# Altium PCB PCB.PcbDoc (part 7 of 10)
Units mm, origin at the board's own origin, x right, y up, seen from the top; angles counter-clockwise.
Board outline 100.5 x 147.95 mm, 6 copper layers (Top Layer, Layer 2 (GND), Layer 3, Layer 4, Layer 5 (AGND), Bottom Layer), stack 1.449 mm thick; 511 components, 297 nets, 1620 pads, 565 vias.
Unrouted connection lines stored in the file: 597.
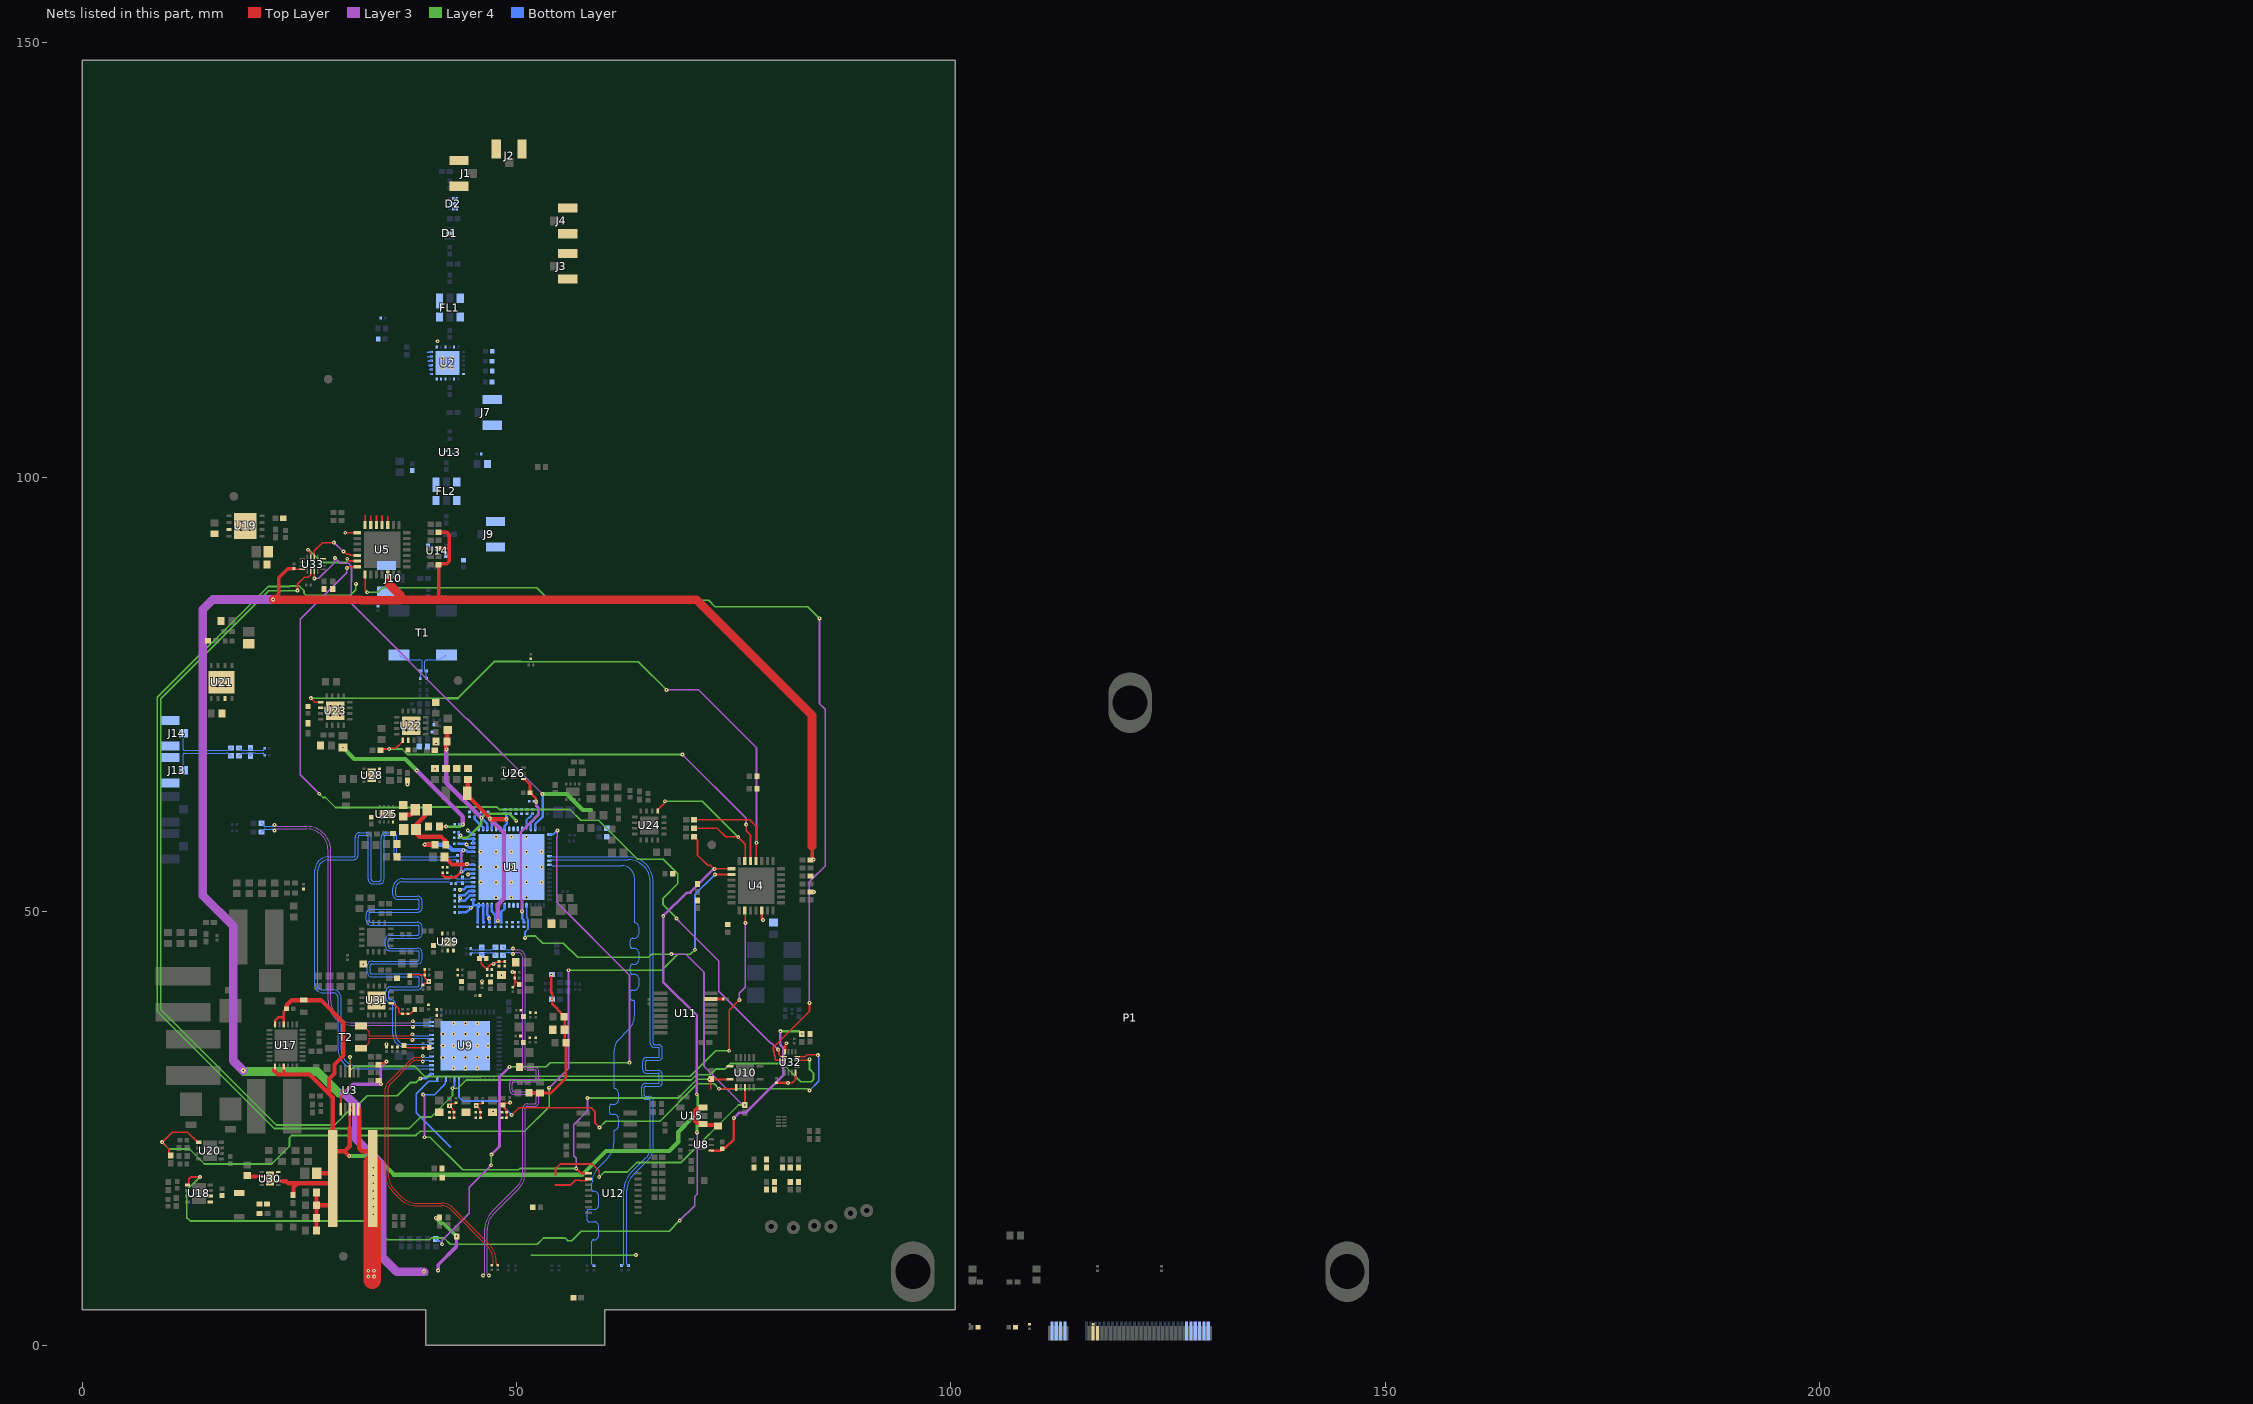
[diagram p5: the nets of this part, all layers, seen from the top]

## Part data (continued)
U18 U20: "IC REG LDO ADJ 1.5A 8DFN", Case/Package=DFN, Dropout Voltage=330mV, Input Bias Current=120uA, Manufacturer 1=Microchip, Max Input Voltage=6V, Max Operating Temperature=125°C, Max Output Current=1.5A, Min Input Voltage=2.3V, Min Operating Temperature=-40°C, Output Voltage=5V, Package Quantity=3300, Reference Voltage=410mV, Supplier Part Number 1=MCP1727T-ADJE/MFCT-ND, Accuracy=0.5%, ComponentLink1Description=https://datasheet.ciiva.com/2057/21999b-2057048.pdf?src-supplier=Digi-Key, ComponentLink1URL=https://datasheet.ciiva.com/2057/21999b-2057048.pdf?src-supplier=Digi-Key, ComponentLink2Description=https://datasheet.ciiva.com/8237/jp027822-8237704.pdf?src-supplier=Avnet, ComponentLink2URL=https://datasheet.ciiva.com/8237/jp027822-8237704.pdf?src-supplier=Avnet, ComponentLink3Description=https://datasheet.ciiva.com/17364/jp027822-17364137.pdf?src-supplier=Avnet+Europe, ComponentLink3URL=https://datasheet.ciiva.com/17364/jp027822-17364137.pdf?src-supplier=Avnet+Europe, Contact Plating=Tin,Matte, Lead Free="Lead Free", Manufacturer Part Number 1=MCP1727T-ADJE/MF, Mount="Surface Mount", Number of Outputs=1, Output Current=1.5A, Output Type=Adjustable, Packaging="Tape and Reel", Polarity=Positive, Pricing 1="1=0.84000, 25=0.71080, 100=0.63860 (USD)", Quiescent Current=120uA, Radiation Hardening=No, RoHS=Yes, Stock 1=9419, Supplier 1=Digi-Key
U19 U21: "Low Dropout Regulators - LDO Micropower 800mA Low Noise Adj Vltg Reg", Dropout Voltage=475mV, Manufacturer 1="Texas Instruments", Max Input Voltage=16V, Max Operating Temperature=125°C, Max Output Current=800mA, Max Output Voltage=5.5V, Min Input Voltage=2.5V, Min Operating Temperature=-40°C, Min Output Voltage=1V, Output Voltage Accuracy=1%, Package Quantity=1000, Quiescent Current=5.5mA, Supplier Part Number 1=LP3878SD-ADJ/NOPBCT-ND, Accuracy=1%, ComponentLink1Description=https://datasheet.ciiva.com/27052/1329588-27052012.pdf?src-supplier=Jameco, ComponentLink1URL=https://datasheet.ciiva.com/27052/1329588-27052012.pdf?src-supplier=Jameco, ComponentLink2Description=https://datasheet.ciiva.com/1571/1846896-1571038.pdf?src-supplier=Farnell, ComponentLink2URL=https://datasheet.ciiva.com/1571/1846896-1571038.pdf?src-supplier=Farnell, ComponentLink3Description=https://datasheet.ciiva.com/7992/1814893-7992723.pdf?src-supplier=Element14, ComponentLink3URL=https://datasheet.ciiva.com/7992/1814893-7992723.pdf?src-supplier=Element14, ComponentLink4Description=https://datasheet.ciiva.com/25626/0900766b810fa759-25626986.pdf?src-supplier=RSComponents, ComponentLink4URL=https://datasheet.ciiva.com/25626/0900766b810fa759-25626986.pdf?src-supplier=RSComponents, ComponentLink5Description=https://datasheet.ciiva.com/6595/lp3878-adj-6595783.pdf?src-supplier=Digi-Key, ComponentLink5URL=https://datasheet.ciiva.com/6595/lp3878-adj-6595783.pdf?src-supplier=Digi-Key, ComponentLink6Description=https://datasheet.ciiva.com/25974/lp3878-adj-25974985.pdf?src-supplier=Avnet+Europe, ComponentLink6URL=https://datasheet.ciiva.com/25974/lp3878-adj-25974985.pdf?src-supplier=Avnet+Europe, ComponentLink7Description=https://datasheet.ciiva.com/3223/lp3878-adj-3223946.pdf?src-supplier=Avnet, ComponentLink7URL=https://datasheet.ciiva.com/3223/lp3878-adj-3223946.pdf?src-supplier=Avnet, ComponentLink8Description=https://datasheet.ciiva.com/6595/lp3878-adj-6595786.pdf?src-supplier=Digi-Key, ComponentLink8URL=https://datasheet.ciiva.com/6595/lp3878-adj-6595786.pdf?src-supplier=Digi-Key, ComponentLink9Description=https://datasheet.ciiva.com/46419/lp3878-adj-46419375.pdf?src-supplier=Element14, ComponentLink9URL=https://datasheet.ciiva.com/46419/lp3878-adj-46419375.pdf?src-supplier=Element14, Contact Plating=Tin,Matte, Height=0.8mm, Lead Free="Lead Free", Length=4mm, Manufacturer Part Number 1=LP3878SD-ADJ/NOPB, Mount="Surface Mount", Number of Outputs=1, Number of Pins=8, Number of Regulators=1, Output Current=800mA, Output Type=Adjustable, Output Voltage=5.5V, Packaging="Tape and Reel", Polarity=Positive, Pricing 1="1=2.14000, 10=1.92200, 100=1.54450, 500=1.26896 (USD)", Radiation Hardening=No, REACH SVHC="No SVHC", RoHS=Yes, Stock 1=29951, Supplier 1=Digi-Key, Width=4mm
U25 U27 U28: "IC REG LIN POS ADJ 500MA 8LFCSP", Case/Package=MSOP, Dropout Voltage=130mV, Manufacturer="Analog Devices", Max Input Voltage=5.5V, Max Operating Temperature=125°C, Max Output Current=500mA, Max Output Voltage=5V, Max Supply Current=210uA, Min Current Limit=550mA, Min Input Voltage=2.3V, Min Operating Temperature=-40°C, Min Output Voltage=800mV, Nominal Supply Current=45uA, Power Supply Rejection Ratio (PSRR)=60dB, Reference Voltage=500mV, Supplier Part Number 1=2457144, Accuracy=1%, ComponentLink1Description=https://datasheet.ciiva.com/17365/adp124-125-17365589.pdf?src-supplier=Avnet+Europe, ComponentLink1URL=https://datasheet.ciiva.com/17365/adp124-125-17365589.pdf?src-supplier=Avnet+Europe, ComponentLink2Description=https://datasheet.ciiva.com/2056/adp124-125-2056955.pdf?src-supplier=Digi-Key, ComponentLink2URL=https://datasheet.ciiva.com/2056/adp124-125-2056955.pdf?src-supplier=Digi-Key, ComponentLink3Description=https://datasheet.ciiva.com/2056/adp124-125-2056954.pdf?src-supplier=Digi-Key, ComponentLink3URL=https://datasheet.ciiva.com/2056/adp124-125-2056954.pdf?src-supplier=Digi-Key, ComponentLink4Description=https://datasheet.ciiva.com/2056/adp124-125-2056956.pdf?src-supplier=Digi-Key, ComponentLink4URL=https://datasheet.ciiva.com/2056/adp124-125-2056956.pdf?src-supplier=Digi-Key, ComponentLink5Description=https://datasheet.ciiva.com/48694/001251247-da-01-en-ic-reg-l-adj-adp125acpz-r7-lfcspud-8-adi-48694599.pdf?src-supplier=Conrad, ComponentLink5URL=https://datasheet.ciiva.com/48694/001251247-da-01-en-ic-reg-l-adj-adp125acpz-r7-lfcspud-8-adi-48694599.pdf?src-supplier=Conrad, ComponentLink6Description=http://datasheet.octopart.com/ADP125ACPZ-R7-Analog-Devices-datasheet-11525030.pdf?src-supplier=Newark, ComponentLink6URL=http://datasheet.octopart.com/ADP125ACPZ-R7-Analog-Devices-datasheet-11525030.pdf?src-supplier=Newark, ComponentLink7Description=http://datasheet.octopart.com/ADP125ACPZ-R7-Analog-Devices-datasheet-38878834.pdf?src-supplier=Newark, ComponentLink7URL=http://datasheet.octopart.com/ADP125ACPZ-R7-Analog-Devices-datasheet-38878834.pdf?src-supplier=Newark, ComponentLink8Description=http://datasheet.octopart.com/ADP125ACPZ-R7-Analog-Devices-datasheet-10623001.pdf?src-supplier=Analog+Devices, ComponentLink8URL=http://datasheet.octopart.com/ADP125ACPZ-R7-Analog-Devices-datasheet-10623001.pdf?src-supplier=Analog+Devices, ComponentLink9Description=http://datasheet.octopart.com/ADP125ACPZ-R7-Analog-Devices-datasheet-8638579.pdf?src-supplier=Analog+Devices, ComponentLink9URL=http://datasheet.octopart.com/ADP125ACPZ-R7-Analog-Devices-datasheet-8638579.pdf?src-supplier=Analog+Devices, ComponentLink10Description=http://datasheet.octopart.com/ADP125ACPZ-R7-Analog-Devices-datasheet-11776558.pdf?src-supplier=Arrow, ComponentLink10URL=http://datasheet.octopart.com/ADP125ACPZ-R7-Analog-Devices-datasheet-11776558.pdf?src-supplier=Arrow, Contact Plating=Gold, Height=0.6mm, Lead Free="Contains Lead", Length=2mm, Manufacturer 2="Analog Devices", Manufacturer Part Number=ADP125ACPZ-R7, Manufacturer Part Number 2=ADP125ACPZ-R7, Number of Outputs=1, Number of Pins=8, Number of Regulators=1, Operating Supply Current=45uA, Output Current=500mA, Output Type=Adjustable, Output Voltage=5V, Packaging="Tape and Reel", Polarity=Positive, Pricing 2="1=1.39000, 10=1.23900, 25=1.17600, 100=0.96600, 250=0.90300, 500=0.79800, 1000=0.63000 (USD)", Quiescent Current=45uA, REACH SVHC="No SVHC", RoHS=Yes, Stock 1=261, Stock 2=12322, Supplier 1=Farnell, Supplier 2=Digi-Key, Supplier Part Number 2=ADP125ACPZ-R7CT-ND, Width=2mm
U29: "TEXAS INSTRUMENTS         TPS7A3501DRVT            LDO Voltage Regulator, Adjustable, 1.71V to 5V in, 330mV drop, 1.21V to 4.5V/1A out, SON-6", Dropout Voltage=330mV, Manufacturer="Texas Instruments", Max Input Voltage=5V, Max Operating Temperature=125°C, Max Output Current=1A, Max Output Voltage=4.5V, Min Current Limit=1.1A, Min Input Voltage=1.71V, Min Operating Temperature=-40°C, Min Output Voltage=1.21V, Package Quantity=250, Quiescent Current=2.2mA, Supplier Part Number 1=296-37133-1-ND, ComponentLink1Description=https://datasheet.ciiva.com/28435/1776766-28435910.pdf?src-supplier=Element14, ComponentLink1URL=https://datasheet.ciiva.com/28435/1776766-28435910.pdf?src-supplier=Element14, ComponentLink2Description=https://datasheet.ciiva.com/29569/tps7a3501-29569542.pdf?src-supplier=Digi-Key, ComponentLink2URL=https://datasheet.ciiva.com/29569/tps7a3501-29569542.pdf?src-supplier=Digi-Key, ComponentLink3Description=https://datasheet.ciiva.com/29569/tps7a3501-29569543.pdf?src-supplier=Digi-Key, ComponentLink3URL=https://datasheet.ciiva.com/29569/tps7a3501-29569543.pdf?src-supplier=Digi-Key, ComponentLink4Description=https://datasheet.ciiva.com/29569/tps7a3501-29569544.pdf?src-supplier=Digi-Key, ComponentLink4URL=https://datasheet.ciiva.com/29569/tps7a3501-29569544.pdf?src-supplier=Digi-Key, ComponentLink5Description=https://datasheet.ciiva.com/30016/tps7a3501-30016008.pdf?src-supplier=Avnet, ComponentLink5URL=https://datasheet.ciiva.com/30016/tps7a3501-30016008.pdf?src-supplier=Avnet, Lead Free="Lead Free", Manufacturer Part Number=TPS7A3501DRVT, Mount="Surface Mount", Number of Outputs=1, Number of Pins=6, Number of Regulators=1, Output Current=1A, Output Type=Adjustable, Output Voltage=4.5V, Packaging="Tape and Reel", Polarity=Positive, Pricing 1="1 = 2,31000, 10 = 2,07200, 100 = 1,66520 (USD)", Radiation Hardening=No, REACH SVHC="No SVHC", RoHS=Yes, Stock 1=4410, Supplier 1=Digi-Key, Weight=0.000342oz
U30: "IC REG BUCK 5V 1A SYNC 8WSON", Case/Package=SOIC, Manufacturer 1="Texas Instruments", Max Input Voltage=17V, Max Operating Temperature=125°C, Max Output Current=1A, Max Output Voltage=5V, Min Input Voltage=3V, Min Operating Temperature=-40°C, Package Quantity=1, Quiescent Current=17uA, Supplier Part Number 1=296-29898-1-ND, Switching Frequency=2.25MHz, ComponentLink1Description=https://datasheet.ciiva.com/4880/slvsam2a-198231-4880752.pdf?src-supplier=Mouser, ComponentLink1URL=https://datasheet.ciiva.com/4880/slvsam2a-198231-4880752.pdf?src-supplier=Mouser, ComponentLink2Description=https://datasheet.ciiva.com/2034/tps62160-2034672.pdf?src-supplier=Digi-Key, ComponentLink2URL=https://datasheet.ciiva.com/2034/tps62160-2034672.pdf?src-supplier=Digi-Key, ComponentLink3Description=https://datasheet.ciiva.com/2034/tps62160-2034673.pdf?src-supplier=Digi-Key, ComponentLink3URL=https://datasheet.ciiva.com/2034/tps62160-2034673.pdf?src-supplier=Digi-Key, ComponentLink4Description=https://datasheet.ciiva.com/2034/tps62160-2034674.pdf?src-supplier=Digi-Key, ComponentLink4URL=https://datasheet.ciiva.com/2034/tps62160-2034674.pdf?src-supplier=Digi-Key, Contact Plating=Gold, Lead Free="Lead Free", Manufacturer Part Number 1=TPS62163DSGR, Min Output Voltage=5V, Number of Outputs=1, Number of Pins=8, Operating Supply Voltage=17V, Output Configuration=Positive, Output Current=1A, Output Type=Fixed, Output Voltage=5V, Packaging="Tape and Reel", Pricing 1="1=1.79000, 10=1.61000, 100=1.29440, 500=1.06348, 1000=0.88117 (USD)", REACH SVHC="No SVHC", RoHS=Yes, Stock 1=19908, Supplier 1=Digi-Key, Synchronous Rectifier=Yes
U31: "IC REG LIN POS ADJ 800MA 16LFCSP", Case/Package="LFCSP EP", Dropout Voltage=70mV, Manufacturer="Analog Devices", Max Input Voltage=3.6V, Max Operating Temperature=125°C, Max Output Current=800mA, Max Output Voltage=3V, Max Supply Current=1.4mA, Min Current Limit=1A, Min Input Voltage=1.6V, Min Operating Temperature=-40°C, Min Output Voltage=750mV, Power Supply Rejection Ratio (PSRR)=65dB, Supplier Part Number 1=ADP1753ACPZ-R7CT-ND, Accuracy=2%, ComponentLink1Description=https://datasheet.ciiva.com/26908/adp1753acpz-r7-26908167.pdf?src-supplier=IIIC, ComponentLink1URL=https://datasheet.ciiva.com/26908/adp1753acpz-r7-26908167.pdf?src-supplier=IIIC, ComponentLink2Description=https://datasheet.ciiva.com/8241/adp1752-1753-8241910.pdf?src-supplier=Avnet, ComponentLink2URL=https://datasheet.ciiva.com/8241/adp1752-1753-8241910.pdf?src-supplier=Avnet, ComponentLink3Description=https://datasheet.ciiva.com/2041/adp1752-1753-2041241.pdf?src-supplier=Digi-Key, ComponentLink3URL=https://datasheet.ciiva.com/2041/adp1752-1753-2041241.pdf?src-supplier=Digi-Key, ComponentLink4Description=https://datasheet.ciiva.com/2041/adp1752-1753-2041242.pdf?src-supplier=Digi-Key, ComponentLink4URL=https://datasheet.ciiva.com/2041/adp1752-1753-2041242.pdf?src-supplier=Digi-Key, ComponentLink5Description=https://datasheet.ciiva.com/2041/adp1752-1753-2041243.pdf?src-supplier=Digi-Key, ComponentLink5URL=https://datasheet.ciiva.com/2041/adp1752-1753-2041243.pdf?src-supplier=Digi-Key, ComponentLink6Description=https://datasheet.ciiva.com/17365/adp1752-1753-17365277.pdf?src-supplier=Avnet+Europe, ComponentLink6URL=https://datasheet.ciiva.com/17365/adp1752-1753-17365277.pdf?src-supplier=Avnet+Europe, Height=0.83mm, Lead Free="Contains Lead", Length=4mm, Manufacturer Part Number=ADP1753ACPZ-R7, Nominal Supply Current=1.4mA, Number of Outputs=1, Number of Pins=16, Number of Regulators=1, Operating Supply Current=1.4mA, Output Current=800mA, Output Type=Adjustable, Output Voltage=3V, Packaging="Tape and Reel", Polarity=Positive, Pricing 1="1 = 2,85000, 10 = 2,56400, 25 = 2,41880, 100 = 2,06070, 250 = 1,93496, 500 = 1,69308 (USD)", Radiation Hardening=No, REACH SVHC="No SVHC", RoHS=Yes, Stock 1=1570, Supplier 1=Digi-Key, Width=4mm
U32 U33: "IC TRNSLTR BIDIRECTIONAL 16UQFN", High Level Output Current=-20uA, Low Level Output Current=20uA, Manufacturer 1="Texas Instruments", Max Operating Temperature=85°C, Max Supply Voltage=3.6V, Min Operating Temperature=-40°C, Min Supply Voltage=900mV, Nominal Supply Current=5uA, Package Quantity=1, Quiescent Current=10uA, Supplier Part Number 1=296-29681-1-ND, ComponentLink1Description=https://datasheet.ciiva.com/1900/txb0304-1900817.pdf?src-supplier=Digi-Key, ComponentLink1URL=https://datasheet.ciiva.com/1900/txb0304-1900817.pdf?src-supplier=Digi-Key, ComponentLink2Description=https://datasheet.ciiva.com/15096/getdatasheetpartid-490462-15096317.pdf?src-supplier=Verical, ComponentLink2URL=https://datasheet.ciiva.com/15096/getdatasheetpartid-490462-15096317.pdf?src-supplier=Verical, ComponentLink3Description=https://datasheet.ciiva.com/1900/txb0304-1900818.pdf?src-supplier=Digi-Key, ComponentLink3URL=https://datasheet.ciiva.com/1900/txb0304-1900818.pdf?src-supplier=Digi-Key, ComponentLink4Description=https://datasheet.ciiva.com/1900/txb0304-1900819.pdf?src-supplier=Digi-Key, ComponentLink4URL=https://datasheet.ciiva.com/1900/txb0304-1900819.pdf?src-supplier=Digi-Key, ComponentLink5Description=https://datasheet.ciiva.com/14287/txb0304-14287243.pdf?src-supplier=Avnet, ComponentLink5URL=https://datasheet.ciiva.com/14287/txb0304-14287243.pdf?src-supplier=Avnet, Contact Plating=Gold, Data Rate=140Mbps, Lead Free="Lead Free", Logic Function=Translator, Manufacturer Part Number 1=TXB0304RSVR, Mount="Surface Mount", Number of Bits=4, Number of Channels=4, Number of Inputs=4, Number of Outputs=4, Number of Pins=16, Packaging="Tape and Reel", Pricing 1="1=1.45000, 10=1.29700, 100=1.01160, 500=0.83564, 1000=0.65972 (USD)", Propagation Delay=4.8ns, Radiation Hardening=No, REACH SVHC="No SVHC", RoHS=Yes, Stock 1=1758, Supplier 1=Digi-Key, Turn-On Delay Time=18.9ns
X1: "OSC VCXO 122.88MHZ LVPECL SMD", Case/Package=SMD/SMT, Frequency=122.88MHz, Manufacturer=Epson, Max Operating Temperature=85°C, Max Supply Current=65mA, Min Operating Temperature=-40°C, Supplier Part Number 1=SER3907CT-ND, ComponentLink1Description=https://datasheet.ciiva.com/29626/vg-4513ca-partnumber-29626986.pdf?src-supplier=Digi-Key, ComponentLink1URL=https://datasheet.ciiva.com/29626/vg-4513ca-partnumber-29626986.pdf?src-supplier=Digi-Key, ComponentLink2Description=https://datasheet.ciiva.com/29626/vg-4513ca-partnumber-29626987.pdf?src-supplier=Digi-Key, ComponentLink2URL=https://datasheet.ciiva.com/29626/vg-4513ca-partnumber-29626987.pdf?src-supplier=Digi-Key, ComponentLink3Description=https://datasheet.ciiva.com/29626/076-vg-4513ca-cb-e13ya-29626988.pdf?src-supplier=Digi-Key, ComponentLink3URL=https://datasheet.ciiva.com/29626/076-vg-4513ca-cb-e13ya-29626988.pdf?src-supplier=Digi-Key, Height=0.071inch, Lead Free="Lead Free", Length=0.276inch, Manufacturer Part Number=VG-4513CA122.8800M-GFCT3, Mount="Surface Mount", Packaging="Tape and Reel", Pricing 1="1 = 9,91000, 10 = 9,29000, 50 = 8,97980, 100 = 8,67020 (USD)", RoHS=Yes, Stock 1=438, Supplier 1=Digi-Key, Width=0.197inch

## Via types
v1: diameter 0.45, hole 0.15, Top Layer to Bottom Layer, 432 vias
v2: diameter 0.5, hole 0.2, Top Layer to Bottom Layer, 132 vias
v3: diameter 0.6, hole 0.2, Top Layer to Bottom Layer, 1 vias

## Nets (pads, with @x,y where several pads share a name; then routed paths per layer and width w, separated by ;. In a path a pad name is that pad's centre, name@x,y a point inside that pad or via, vN(x,y) a via of type N, cw(c..) or ccw(c..) an arc to the next point about the centre after c; other vN are vias at no path point)
1.8V_SPI_ADC: C95.2 C136.2 C137.2 C244.1 C250.2 R28.2 R29.2 R31.2 R101.2 R135.2 U1.13 U1.38 U10.14 U11.15 U26.1 | length 23.9
  Top Layer w0.3: U26.1@50.794,65.249 50.919,65.249 51.544,64.624 51.544,63.698 52.192,63.05 52.192,62.706 v1(52.221,62.677) ; U11.15@72.393,39.944 72.407,39.929 73.779,39.929 C244.1@73.779,39.919
  Layer 3 w0.3: v1(50.62,50.028) 50.62,51.29 50.468,51.443 50.468,59.096 52.475,61.102 52.475,61.966 52.246,62.195 52.246,62.652 v1(52.221,62.677)
  Bottom Layer w0.3: U1.38@50.637,50.722 50.637,49.198 50.839,48.997 50.839,48.783 C137.2@50.849,48.783 ; U1.13@51.637,59.522 51.637,60.26 52.475,61.097 52.475,61.957 52.249,62.182 52.249,62.649 v1(52.221,62.677)
1V8: C238.2 R131.1 R134.1 U8.1 | length 21.2
  Top Layer w0.3: U8.1@72.395,22.479 73.479,22.479 73.684,22.684 C238.2@73.684,22.689 73.684,22.694 73.804,22.814 74.069,22.814 75.004,23.749 v1(75.004,26.228)
  Layer 3 w0.3: v1(75.004,26.228) 75.605,26.829 76.367,26.829 80.685,31.147 80.685,34.34 80.364,34.661 v1(80.364,36.236)
  Layer 4 w0.3: v1(80.364,36.236) 82.457,36.236 82.787,35.906 v1(82.828,35.906)
3.3V: C44.2 C239.2 C241.2 C249.2 C?.2@103.12,2.15 C?.2@107.445,2.15 P1.6 P1.8 P1.10 R16.2 R17.1 R18.1 R83.2 R111.1 R112.1 R113.2 R114.2 R115.2 R123.2 R124.2 R125.2 R127.2 R128.2 R136.2 R137.2 U3.6 U4.5 U5.5 U32.8 U32.16 U33.8 U33.16 | length 225.1
  Top Layer w0.2: C241.2@24.357,89.494 24.367,89.494 24.453,89.408 U33.8@25.309,89.408 ; U3.6@29.77,27.228 29.77,28.709 30.123,29.062 v1(30.123,29.098) ; U5.5@35.159,88.808 35.159,87.689 35.259,87.589 ; v1@39.343,8.541 v1(39.343,8.55) ; v1(81.227,30.267) 81.244,30.284 81.752,30.284 82.107,30.638 U32.8@82.107,31.48
  Top Layer w0.3: R112.1@34.11,30.546 34.16,30.546 34.31,30.396 34.31,30.346 34.336,30.321 34.336,30.169 v1(34.364,30.14) ; R111.1@34.11,32.375 34.26,32.525 34.779,32.525 34.984,32.731 v1(35.025,32.731) ; v1@78.22,49.175 U4.5@78.22,50.124 ; C239.2@79.932,30.286 81.208,30.286 v1(81.227,30.267) ; U32.16@80.907,33.88 80.907,34.555
  Top Layer w0.4: v1(21.969,85.918) 22.63,86.579 22.63,88.433 23.66,89.464 C241.2@24.357,89.464 ; U5.5@35.159,88.808 35.174,88.793 35.174,87.818 35.209,87.783 ; 40.861,85.896 41.012,86.047 R123.2@41.012,89.931 41.112,90.031 41.957,90.031 42.264,90.338 42.264,91.811 ; R125.2@41.012,91.811 42.264,91.811 ; R124.2@41.012,93.665 41.984,93.665 42.264,93.386 42.264,91.811 ; R114.2@83.829,55.921 83.879,55.921 83.979,56.021 83.979,56.071 84.007,56.098 84.007,57.546
  Top Layer w1: v1(21.969,85.918) 21.991,85.896 32.074,85.896 32.139,85.831 36.579,85.831 36.644,85.896 ; 35.209,87.783 36.644,86.348 36.644,85.896 ; 84.007,57.546 84.007,72.585 70.696,85.896 40.861,85.896 36.644,85.896
  Layer 3 w0.3: v1(34.364,30.14) 34.364,32.07 v1(35.025,32.731)
  Layer 3 w0.4: v1(30.123,29.098) 31.164,30.14 v1(34.364,30.14)
  Layer 3 w1: v3(18.515,31.689) 17.372,32.832 17.372,48.352 13.867,51.856 13.867,84.776 15.01,85.918 v1(21.969,85.918) ; v1(30.123,29.098) 31.556,27.665 31.556,23.771 34.54,20.786 34.54,10.203 36.193,8.55 v1(39.343,8.55)
  Layer 4 w1: v3@18.616,31.588 27.049,31.588 29.538,29.098 v1(30.123,29.098)
  Bottom Layer w0.2: v1(39.343,8.55) 39.714,8.179 39.747,8.179
  other v1: 81.05,34.839 78.383,49.037 84.225,52.263 84.199,55.972
3.3Vaux: P1.2 P1.4 R23.2 R24.2 | length 8.5
  Top Layer w0.2: v1(40.689,14.722) 41.052,14.722 R24.2@41.121,14.791
  Top Layer w0.4: v1(40.968,8.677) v1@40.976,8.669
  Layer 3 w0.4: v1(40.968,8.677) 40.978,8.686 40.978,9.347 43.077,11.445 v1(43.077,12.614)
  Layer 4 w0.4: v1(40.689,14.722) 41.272,14.139 41.552,14.139 v1(43.077,12.614)
5V: C59.2 C148.2 L9.2 R133.2 U18.1 U18.2 U30.6 | length 2.4
  Top Layer w0.3: 19.955,19.506 U30.6@20.639,19.506
  Top Layer w0.5: L9.2@17.769,17.595 L9.2@18.044,17.595 ; L9.2@18.119,17.52 L9.2@18.044,17.595 ; L9.2@18.319,17.595 L9.2@18.044,17.595 ; C148.2@18.997,19.599 19.09,19.506 19.955,19.506 ; 20.332,16.322 20.382,16.322 20.392,16.313 ; R133.2@20.392,15.24 R133.2@20.402,15.23
12V: C33.2 C40.1 C41.1 C42.1 C43.1 C49.2 C149.2 L4.1 R15.2 R100.2 U3.8 U3.9 U15.1 U15.3 U17.9 U17.11 U17.26 U17.28 U30.2 | length 117.5
  Top Layer w0.3: U17.28@22.184,36.986 22.209,37.011 22.209,37.481 22.556,37.827 23.184,37.827 ; U30.2@22.539,19.006 22.564,18.981 23.075,18.981 23.097,18.959 ; U17.11@23.184,32.186 23.209,32.161 23.209,31.526 23.496,31.239 ; U17.26@23.184,36.986 23.184,37.827 ; C49.2@23.496,38.801 23.491,38.801 23.184,38.494 23.184,37.827 ; R15.2@29.132,20.361 R15.2@29.132,22.393 ; 30.77,25.095 U3.8@30.77,27.228 U3.9@31.27,27.228
  Top Layer w0.5: 22.109,31.791 22.109,31.65 22.52,31.239 23.496,31.239 26.18,31.239 28.395,29.024 ; 23.097,18.959 23.106,18.95 23.462,18.95 23.702,18.71 24.763,18.71 ; C49.2@23.496,38.801 23.501,38.801 23.521,38.821 23.521,39.227 24.1,39.805 L4.1@25.492,39.805 27.467,39.805 30.072,37.201 30.072,33.442 29.032,32.402 29.032,31.358 28.395,30.721 28.395,29.024 ; R100.2@24.255,17.356 24.305,17.406 24.305,18.252 24.763,18.71 ; C40.1@26.964,13.281 C41.1@26.964,14.739 C42.1@26.964,16.191 ; C43.1@26.964,17.653 C42.1@26.964,16.191 ; C149.2@27.013,19.878 28.555,19.878 R15.2@28.83,20.153 ; 28.83,28.59 28.395,29.024 ; R15.2@29.132,22.393 30.176,22.393 ; v1(30.732,21.859) 30.709,21.859 30.176,22.393 ; 30.77,25.095 30.77,22.987 30.176,22.393 ; U15.3@71.448,27.434 71.348,27.334 70.812,27.334 70.498,27.021 70.498,25.948 70.762,25.684 71.148,25.684 71.298,25.534 U15.1@71.448,25.534 71.548,25.434 73.065,25.434 C33.2@73.201,25.298 ; 24.763,18.71 28.555,18.71 R15.2@28.83,18.985 ; C42.1@26.964,16.191 28.555,16.191 28.83,16.466 R15.2@28.83,18.985 ; 28.395,29.024 28.395,28.997 28.83,28.562 R15.2@28.83,20.153 ; R15.2@28.83,18.985 R15.2@28.83,19.262 R15.2@28.83,20.153
  Layer 4 w0.5: v1(30.732,21.859) 33.729,21.859 35.871,19.718 57.572,19.718 60.283,22.429 67.562,22.429 68.599,23.465 68.599,24.623 v1(70.255,26.279)
04610_CS: R25.1 R29.1 U9.12 U10.1 U12.1 | length 56.6
  Top Layer w0.2: v1@56.801,20.412 v1(56.869,20.412) ; 72.363,29.556 72.363,30.68 R25.1@72.414,30.731 72.489,30.656 74.253,30.656 74.307,30.71 U10.1@74.567,30.71
  Top Layer w0.254: v1(56.869,20.412) 57.413,19.867 U12.1@58.261,19.867
  Layer 3 w0.2: v1(39.241,28.921) 39.394,28.768 v1(39.394,24.018) ; v1(56.869,20.412) 56.869,21.6 56.572,21.896 56.572,25.449 58.164,27.041 v1(58.164,28.54)
  Layer 4 w0.2: v1(39.394,24.018) 40.029,24.018 43.779,20.268 50.218,20.268 50.362,20.412 v1(56.869,20.412) ; v1(58.164,28.54) 68.604,28.54 70.763,30.699 v1(72.16,30.699) v1@72.113,30.652
  Bottom Layer w0.2: v1(39.241,28.921) 40.539,28.921 41.781,30.162 41.781,30.572 U9.12@41.861,30.652
4610_FINE_V: C150.2 C151.2 C154.2 C155.2 C166.2 C167.2 C169.2 C195.2 C196.2 C207.2 C208.2 FB15.1 FB16.1 FB19.1 FB23.1 FB26.1 U29.5 U29.6
  other v1: 47.318,26.99 48.248,42.684
04610_RESET: U9.15 U33.10 | length 98.9
  Top Layer w0.2: v1(24.763,86.96) 24.763,87.675 25.575,88.486 26.037,88.486 26.309,88.758 U33.10@26.309,89.208
  Layer 4 w0.2: v1(24.763,86.96) 24.738,86.934 21.481,86.934 9.034,74.488 9.034,38.731 22.337,25.428 29.056,25.428 30.739,27.111 31.132,27.111 32.815,28.794 36.275,28.794 37.816,30.335 38.445,30.335 v1(38.911,30.8)
  Bottom Layer w0.3: v1(38.911,30.8) 38.936,30.826 39.614,30.826 40.091,31.302 U9.15@40.211,31.302
04610_RESET_3.3: U5.27 U33.3 | length 7.8
  Top Layer w0.2: v1(25.982,91.659) 25.982,91.591 26.309,91.265 U33.3@26.309,90.808 ; v1(30.504,90.617) 30.504,90.573 30.719,90.358 U5.27@31.659,90.358
  Layer 4 w0.2: v1(25.982,91.659) 26.084,91.659 27.562,90.18 30.387,90.18 30.456,90.25 30.456,90.569 v1(30.504,90.617)
04610_STATUS0: U9.9 U10.2 U32.12 | length 56.8
  Top Layer w0.2: v1(49.427,26.584) 50.267,27.424 58.576,27.424 59.032,26.968 59.032,25.64 v1(59.536,25.136) ; v1(73.303,29.606) 75.252,29.606 75.292,29.646 U10.2@75.292,29.735 ; U32.12@82.356,33.28 83.201,33.28 83.431,33.51 84.639,33.51 v1(84.682,33.467)
  Layer 4 w0.2: v1(59.536,25.136) 60.272,25.873 66.502,25.873 70.795,30.165 72.744,30.165 v1(73.303,29.606) 83.513,29.606 v1(83.717,29.403)
  Bottom Layer w0.2: U9.9@43.361,30.652 43.361,28.636 43.805,28.192 47.819,28.192 v1(49.427,26.584) ; v1(83.717,29.403) 84.775,30.462 84.775,33.374 v1(84.682,33.467)
04610_STATUS0_3.3: U5.28 U32.1 | length 103.3
  Top Layer w0.2: v1(30.453,89.55) 30.521,89.55 30.678,89.708 U5.28@31.659,89.708 ; v1(80.11,34.102) 80.11,34.035 80.211,33.933 80.211,33.55 80.482,33.28 U32.1@80.757,33.28
  Layer 3 w0.2: v1(27.278,63.566) 25.093,65.751 25.093,83.658 30.453,89.017 v1(30.453,89.55) ; v1(68.426,49.215) 68.426,49.148 68.705,48.868 68.705,48.86 73.26,44.305 73.26,40.819 79.249,34.83 79.382,34.83 v1(80.11,34.102)
  Layer 4 w0.2: v1(27.278,63.566) 27.71,63.134 27.989,63.134 29.149,61.974 39.527,61.974 39.602,62.049 47.725,62.049 48.02,61.754 56.146,61.754 57.399,60.501 59.426,60.501 63.913,56.014 66.891,56.014 68.553,54.352 68.553,53.234 66.859,51.541 66.859,50.782 v1(68.426,49.215)
04610_STATUS1: U9.10 U32.11 | length 156.6
  Top Layer w0.2: U32.11@82.307,32.88 83.544,32.88 83.649,32.985 v1(83.717,32.985)
  Layer 4 w0.2: v1(31.484,87.734) 31.484,87.051 30.859,86.426 25.75,86.426 25.525,86.651 25.525,86.94 24.981,87.485 23.923,87.485 23.863,87.425 21.406,87.425 8.634,74.653 8.634,38.496 22.103,25.028 37.64,25.028 38.961,26.349 40.149,26.349 42.619,28.819 v1(42.619,29.657) 43.249,29.657 44.194,30.602 70.101,30.602 70.722,31.224 72.284,31.224 72.925,31.864 73.954,31.864 74.6,32.51 80.61,32.51 82.718,30.402 83.903,30.402 84.191,30.69 84.191,31.361 83.725,31.826 83.725,32.976 v1(83.717,32.985)
  Bottom Layer w0.2: v1(42.619,29.657) 42.619,29.725 42.841,29.946 42.841,30.632 U9.10@42.861,30.652
04610_STATUS1_3.3: U5.1 U32.2 | length 110.5
  Top Layer w0.2: U5.1@32.559,88.808 32.559,87.055 32.79,86.824 v1(32.79,86.756) ; U32.2@80.707,32.88 79.91,32.88 79.78,33.01 79.78,33.346 79.656,33.47 79.656,33.814 79.585,33.885 79.585,34.41 83.717,38.541 v1(83.717,39.487)
  Layer 3 w0.2: v1(83.717,39.487) 83.674,39.529 83.674,53.395 83.982,53.703 83.988,53.703 85.537,55.252 85.537,73.27 84.86,73.948 v1(84.86,83.759)
  Layer 4 w0.2: v1(32.79,86.756) 34.005,86.756 34.53,87.281 52.329,87.281 53.762,85.848 72.097,85.848 72.84,85.105 83.513,85.105 v1(84.86,83.759)
04610_SYNC: P1.12 U9.14 | length 23
  Layer 4 w0.2: 51.687,10.429 51.7,10.442 63.714,10.442 v1(63.727,10.455)
  Bottom Layer w0.2: U9.14@40.861,30.652 40.861,30.497 40.817,30.452 39.884,30.452 38.445,29.014 38.445,26.84 42.426,22.86
9690_AGND_SR: C93.1 C96.1 C97.1 C98.1 C138.1 C139.1 C140.1 C141.1 FB11.1 R72.1 U1.56 U1.60 U25.4 U25.9 | length 15.7
  Top Layer w0.3: C138.1@41.49,54.473 41.49,54.188 41.715,53.963 43.003,53.963 v1(43.62,54.579)
  Top Layer w0.5: FB11.1@36.93,60.935 37.13,61.135 37.811,61.135 38.313,61.637 C141.1@38.313,61.737 ; v1@39.419,57.699 C93.1@40.587,57.699
  Layer 3 w0.3: v1(43.62,54.579) 43.62,56.753 43.889,57.023 v1(43.889,57.064)
  Bottom Layer w0.3: v1(43.62,54.579) 43.747,54.579 43.778,54.549 44.1,54.872 U1.56@44.987,54.872 ; v1(43.889,57.064) 44.145,57.064 44.337,56.872 U1.60@44.987,56.872
  Bottom Layer w0.5: v1(39.419,57.724) 39.444,57.699 41.978,57.699 42.587,57.089 43.864,57.089 v1(43.889,57.064)
9690_AVDD1_PG: R107.1 U4.18 U23.5 | length 80.9
  Top Layer w0.2: v1(26.313,74.564) 26.781,74.096 U23.5@27.441,74.096 ; R107.1@70.425,60.569 76.833,60.569 77.621,59.782 v1(77.621,57.927) 77.595,57.902 77.595,55.85 U4.18@77.57,55.824
  Layer 3 w0.2: v1(67.257,75.53) 70.94,75.53 77.633,68.837 77.621,68.824 v1(77.621,57.927)
  Layer 4 w0.2: v1(26.313,74.564) 41.883,74.564 ; 50.513,78.775 50.527,78.775 64.012,78.775 64.071,78.716 v1(67.257,75.53)
  Layer 4 w0.254: 41.883,74.564 43.214,74.564 47.425,78.775 50.513,78.775
9690_AVDD2_PG: R106.1 U4.19 U22.5 | length 52.7
  Top Layer w0.2: R106.1@34.306,68.57 34.448,68.711 v1(35.336,68.711) 35.414,68.789 36.099,68.789 36.889,69.579 U22.5@36.889,69.729 ; v1(76.427,60.01) 76.427,59.299 76.915,58.811 76.915,55.83 U4.19@76.92,55.824
  Layer 3 w0.2: v1(69.086,68.087) 76.427,60.747 v1(76.427,60.01)
  Layer 4 w0.2: v1(35.336,68.711) 36.804,68.711 37.428,68.087 v1(69.086,68.087)
9690_CS: R26.1 R31.1 U1.37 U10.4 U12.2 | length 77.1
  Top Layer w0.2: 54.456,18.532 56.234,18.532 56.759,19.057 57.264,19.057 57.304,19.017 58.061,19.017 U12.2@58.261,19.217 ; 54.481,19.675 54.481,20.412 55.015,20.945 58.698,20.945 59.51,20.132 v1(59.51,19.446) v1@59.443,19.446 ; R26.1@76.282,28.006 76.292,28.016 U10.4@76.292,29.735
  Layer 3 w0.2: v1(67.816,45.1) 69.493,45.1 71.567,43.026 71.567,32.2 76.04,27.727 v1(76.249,27.727)
  Layer 4 w0.2: v1(50.976,46.98) 51.044,46.98 51.239,47.175 52.172,47.175 52.987,46.36 55.387,46.36 57.019,44.728 65.176,44.728 65.549,45.1 v1(67.816,45.1) ; v1(59.51,19.446) 60.076,20.012 62.743,20.012 63.854,21.123 68.934,21.123 75.538,27.727 v1(76.249,27.727)
  Bottom Layer w0.2: v1(50.976,46.98) 50.976,47.656 51.309,47.989 51.309,49.058 51.289,49.078 51.289,49.183 51.156,49.316 51.156,50.703 U1.37@51.137,50.722
9690_DVDD1_PG: R108.1 U4.20 U24.5 | length 20.2
  Top Layer w0.2: U24.5@66.251,61.584 66.251,61.734 67.032,62.514 67.032,62.655 v1(67.08,62.703) ; R108.1@70.407,59.604 73.067,59.604 74.057,58.613 75.462,58.613 76.31,57.765 76.31,55.865 U4.20@76.27,55.824
  Layer 4 w0.2: v1(67.08,62.703) 71.372,62.703 v1(75.512,58.562)
9690_FAST_DETECT: R22.2 U1.17 | length 70
  Layer 3 w0.2: v1(41.426,11.699) 41.426,12.157 44.551,15.282 44.551,18.28 v1(47.064,20.793) ; v1(54.684,59.35) 54.684,58.555 54.617,58.488 54.617,51.052 62.99,42.679 v1(62.99,32.604)
  Layer 3 w0.3: v1(47.09,22.012) 48.03,22.952 48.03,30.978 v1(49.173,32.121)
  Layer 4 w0.2: v1(47.064,20.793) 47.09,20.818 v1(47.09,22.012) ; v1(49.173,32.121) 53.389,32.121 53.872,32.604 v1(62.99,32.604)
  Bottom Layer w0.2: R22.2@40.689,12.32 40.689,12.27 40.889,12.07 41.113,12.07 41.426,11.758 v1(41.426,11.699) ; U1.17@53.787,58.872 53.798,58.882 54.217,58.882 v1(54.684,59.35)
9690_PDWN: U1.14 U33.11 | length 52.8
  Top Layer w0.2: v1(26.709,88.368) U33.11@26.709,89.208
  Layer 3 w0.2: v1(26.709,88.368) 26.719,88.378 27.234,88.378 29.042,90.187 29.042,90.59 29.122,90.67 29.125,90.67 29.703,90.092 30.654,90.092 30.978,89.768 30.978,87.97 30.959,87.951 30.959,85.482 44.231,72.211 44.313,72.211 v1(52.983,63.541)
  Layer 3 w0.3: v1@29.107,90.688 v1@29.122,90.703
  Layer 4 w0.5: v1(52.983,63.541) 55.762,63.541 57.601,61.701 58.556,61.701
  Bottom Layer w0.3: U1.14@52.137,59.522 52.137,60.052 52.985,60.9 52.985,63.539 v1(52.983,63.541)
  other v1: 29.09,90.705
9690_PDWN_3.3: U5.26 U33.2 | length 6.7
  Top Layer w0.2: U33.2@26.709,90.808 26.709,91.532 27.648,92.471 v1(28.954,92.471) ; v1(30.072,91.455) 30.14,91.455 30.453,91.142 30.721,91.142 30.855,91.008 U5.26@31.659,91.008
  Layer 3 w0.2: v1(28.954,92.471) 29.005,92.471 30.021,91.455 v1(30.072,91.455)
9690_V_1P0: C229.2 R32.1 | length 2.2
  Bottom Layer w0.2: 51.156,59.541 51.137,59.522 51.137,60.565 51.39,60.817 51.489,60.817 51.665,60.993 51.665,61.092 C229.2@51.84,61.267 51.83,61.267 C229.2@51.78,61.217
+12V: P1.60 P1.62 P1.64 P1.66 R15.1 U3.10 | length 22.7
  Top Layer w0.5: U3.10@31.87,27.228 31.87,22.74 32.218,22.392 33.155,22.392 33.43,22.117 R15.1@33.43,19.262
  Top Layer w2: 33.374,7.539 33.374,15.14 33.374,17.82 R15.1@33.374,21.072
  other v1: 32.917,7.966 33.602,7.966 32.917,8.651 33.577,8.651 33.509,15.14 33.509,16.034 33.509,16.927 33.509,17.82 33.509,18.713 33.509,19.607 33.509,20.5
ADC1_3.3_PG: R103.2 U4.22 U18.5 | length 119.7
  Top Layer w0.2: U18.5@12.125,18.534 12.25,18.534 12.25,19.179 12.503,19.431 v1(13.543,19.431) ; R103.2@70.407,58.613 70.457,58.613 70.822,58.248 70.822,56.496 71.982,55.337 72.312,55.337 72.744,54.905 v1(72.795,54.905) 72.804,54.915 74.71,54.915 U4.22@74.72,54.924
  Layer 3 w0.2: v1(68.781,14.443) 70.492,16.153 70.492,17.2 70.78,17.488 70.78,24.56 v1(70.763,24.577) ; v1@72.738,54.905 v1(72.795,54.905)
  Layer 3 w0.3: v1(70.737,28.971) 70.737,38.039 66.86,41.916 66.86,49.453 v1(66.876,49.469) 69.594,52.187 70.02,52.187 70.02,52.258 72.639,54.876 72.725,54.876 72.738,54.889 v1@72.738,54.905
  Layer 4 w0.2: v1(13.543,19.431) 13.52,19.431 12.027,17.939 12.027,14.762 12.417,14.372 32.97,14.372 35.126,12.216 39.992,12.216 40.197,12.421 41.632,12.421 42.364,11.689 52.36,11.689 53.092,12.421 55.583,12.421 55.889,12.114 56.324,12.114 57.421,13.211 67.55,13.211 v1(68.781,14.443)
  Layer 4 w0.3: v1(70.737,28.971) 70.737,28.931 70.855,28.813 70.855,25.619 70.763,25.527 v1(70.763,24.577)
ADC2_3.3_PG: R110.2 U4.23 U20.5 | length 99.7
  Top Layer w0.2: R110.2@10.184,21.928 9.984,22.128 9.984,22.669 v1(9.193,23.46) 10.336,24.603 12.114,24.603 13.274,23.442 U20.5@13.399,23.442 ; v1(72.82,54.244) 72.835,54.259 74.705,54.259 U4.23@74.72,54.274
  Layer 3 w0.2: v1(53.745,29.708) 55.98,31.943 v1(55.98,43.246)
  Layer 4 w0.2: v1(9.193,23.46) 9.98,22.672 12.344,22.672 14.071,20.945 21.791,20.945 23.849,23.002 23.849,23.968 24.109,24.228 38.407,24.228 38.884,24.706 38.886,24.704 50.9,24.704 53.745,27.549 v1(53.745,29.708) ; v1(55.98,43.246) 66.705,43.246 68.54,45.081 70.007,45.081 v1(70.534,45.608)
  Bottom Layer w0.2: v1(70.534,45.608) 70.534,51.99 72.789,54.244 v1(72.82,54.244)
ADC_CLK9690_N: C189.2 R14.2 U1.54 | length 2.2
  Bottom Layer w0.112: C189.2@43,53.99 43.071,53.92 cw(c43.016,53.864) 43.094,53.864 ccw(c43.173,53.864) 43.117,53.809 ccw(c43.221,53.912) 43.221,53.766 43.578,53.766 43.583,53.771 ccw(c43.583,53.918) 43.687,53.814 43.731,53.858 43.818,53.771 43.942,53.771 43.947,53.766 44.68,53.766 44.787,53.872 U1.54@44.987,53.872 U1.54@44.968,53.853
ADC_CLK9690_P: C188.2 R14.1 U1.53 | length 2.2
  Bottom Layer w0.112: C188.2@43,53.228 43.071,53.299 ccw(c43.016,53.355) 43.094,53.355 cw(c43.173,53.355) 43.117,53.41 cw(c43.221,53.307) 43.221,53.453 43.578,53.453 43.583,53.448 cw(c43.583,53.301) 43.687,53.405 43.731,53.361 43.818,53.448 43.942,53.448 43.947,53.453 44.705,53.453 44.787,53.372 U1.53@44.987,53.372
AGND: C1.2 C2.2 C4.1 C7.1 C8.1 C9.1 C10.1 C11.2 C12.2 C13.2 C14.2 C20.1 C26.1 C27.1 C30.1 C31.1 C67.1 C68.1 C71.1 C73.1 C74.1 C75.1 C77.1 C78.1 C79.1 C82.1 C83.1 C84.1 C99.1 C100.1 C101.1 C102.1 C103.1 C104.1 C105.1 C106.1 C107.1 C108.1 C109.1 C110.1 C111.1 C113.1 C114.1 C115.1 C116.1 C117.1 C118.1 C119.1 C120.1 C121.1 C122.1 C123.1 C124.1 C125.1 C136.1 C137.1 C143.1 C144.1 C145.1 C146.1 C150.1 C151.1 C152.1 C153.1 C154.1 C155.1 C156.1 C157.1 C158.1 C159.1 C160.1 C161.1 C162.1 C163.1 C164.1 C165.1 C166.1 C167.1 C169.1 C170.1 C174.1 C180.1 C181.1 C182.1 C184.1 C190.1 C191.1 C192.1 C193.1 C194.1 C195.1 C196.1 C197.1 C198.1 C199.1 C200.1 C201.1 C202.1 C203.1 C204.1 C205.1 C206.1 C207.1 C208.1 C211.1 C212.1 C213.1 C214.1 C215.1 C216.1 C217.1 C218.1 C219.1 C220.1 C221.2 C229.1 D1.7 D2.2 D2.3 D2.4 D2.5 D2.7 FB5.2 FB6.2 FB7.2 FB8.2 FB9.2 FB11.2 FB21.1 FB29.2 FB31.2 FB32.2 FB33.2 FB34.2 FB36.2 FL1.1 FL1.3 FL1.4 FL1.6 FL2.1 FL2.3 FL2.4 FL2.6 J1.1 J1.3 J2.1 J2.3 J3.1 J3.3 J4.1 J4.3 J7.1 J7.3 J9.1 J9.3 J10.1 J10.3 J13.1 J13.3 J14.1 J14.3 R62.1 R64.1 R66.1 R68.1 R76.1 R88.1 R?.1@56.525,5.55 U1.65 U2.1 U2.3 U2.5 U2.12 U2.14 U2.16 U2.17 U2.18 U2.25 U9.57 U13.1 U13.4 U14.2 U14.4 U19.3 U19.9 U21.3 U21.9 U22.6 U22.17 U23.6 U23.17 U28.4 U28.9 U29.3 U29.7 U30.4 U30.9 U31.6 U31.17 | length 26.5
  Top Layer w0.165: U31.6@35.557,39.441 35.756,39.441 36.411,38.787 36.411,38.483 36.664,38.23 C211.1@36.854,38.23 ; C190.1@37.031,34.577 37.031,34.572 37.249,34.355 37.418,34.355 37.454,34.319 37.817,34.319 37.843,34.293 C201.1@39.216,34.293 39.279,34.356 C202.1@39.952,34.356 ; C212.1@37.489,38.236 37.486,38.233 36.857,38.233 C211.1@36.854,38.23 ; C221.2@37.692,42.62 37.774,42.703 C158.1@39.44,42.703 ; C214.1@38.267,38.725 38.262,38.725 37.767,38.23 37.486,38.23 C211.1@36.854,38.23 ; C160.1@39.207,41.544 39.217,41.544 39.423,41.75 39.712,41.75 39.9,41.938 v1(39.9,41.943) 39.9,41.948 39.44,42.407 C158.1@39.44,42.703 ; C159.1@39.44,43.339 C158.1@39.44,42.703 ; C150.1@42.787,26.258 C151.1@42.787,26.908 42.787,27.132 42.267,27.652 v1(42.267,27.657) 42.267,27.662 42.454,27.849 42.879,27.849 43.017,27.987 C152.1@43.027,27.987 ; C169.1@45.735,44.592 45.74,44.592 45.927,44.405 45.927,43.996 46.596,43.328 C155.1@46.596,43.318 46.663,43.385 46.663,43.575 47.017,43.928 47.264,43.928 v1(47.318,43.983) 47.396,43.983 47.594,44.181 47.911,44.181 C207.1@47.979,44.249 C208.1@48.639,44.249 ; C166.1@45.836,26.258 45.836,27.17 45.344,27.662 v1(45.344,27.667) 45.344,27.672 45.531,27.86 45.953,27.86 46.081,27.987 C174.1@46.091,27.987 ; C195.1@48.839,26.258 C196.1@48.839,26.908 48.839,27.098 48.624,27.313 48.624,27.547 C198.1@48.436,27.734 48.436,27.739 48.624,27.927 49.044,27.927 49.188,28.07 C197.1@49.198,28.07 49.441,28.07 49.441,28.013 49.434,28.006 v1(49.249,28.006) ; C164.1@49.545,41.309 49.555,41.309 49.779,41.532 C162.1@49.779,42.343 ; C163.1@49.779,43.018 C162.1@49.779,42.343 ; C165.1@50.299,41.592 50.299,41.597 49.846,42.049 49.846,42.275 C162.1@49.779,42.343
  other v1: 35.025,34.712 46.023,41.976 49.528,43.043 32.332,43.947 37.438,64.649 40.601,66.451 40.736,69.354 40.912,115.661
  other v2: 21.589,18.756 21.589,19.756 42.761,31.952 44.111,31.952 45.461,31.952 41.511,33.202 42.761,33.202 44.111,33.202 45.461,33.202 46.711,33.202 41.511,34.552 42.761,34.552 44.111,34.552 45.461,34.552 46.711,34.552 41.511,35.902 42.761,35.902 44.111,35.902 45.461,35.902 46.711,35.902 42.761,37.152 44.111,37.152 45.461,37.152 33.332,39.216 34.432,39.216 33.332,40.316 34.432,40.316 41.586,46.497 42.586,46.497 47.637,51.622 49.387,51.622 51.137,51.622 45.887,53.372 47.637,53.372 49.387,53.372 51.137,53.372 52.887,53.372 45.887,55.122 47.637,55.122 49.387,55.122 51.137,55.122 52.887,55.122 45.887,56.872 47.637,56.872 49.387,56.872 51.137,56.872 52.887,56.872 47.637,58.622 49.387,58.622 51.137,58.622 37.314,70.854 38.414,70.854 37.314,71.954 38.414,71.954 28.566,72.571 29.666,72.571 28.566,73.671 29.666,73.671 15.526,75.919 16.526,75.919 15.526,76.919 16.526,76.919 18.276,93.891 19.276,93.891 18.276,94.891 19.276,94.891 41.5,112.605 42.6,112.605 41.5,113.705 42.6,113.705
Alert: R83.1 U3.3 U4.2 | length 65.8
  Top Layer w0.2: U3.3@30.77,31.628 30.789,31.647 30.789,33.219 v1(30.808,33.239) ; v1(74.471,33.975) 74.471,38.649 v1(75.639,39.817) ; U4.2@76.27,50.124 76.31,50.084 76.31,48.722 v1(76.351,48.682)
  Layer 3 w0.2: v1(74.471,33.975) v1@74.496,33.975 ; v1(75.639,39.817) 75.639,40.579 76.334,41.273 76.334,48.665 v1(76.351,48.682)
  Layer 4 w0.2: v1(30.808,33.239) 30.808,31.638 31.342,32.172 38.282,32.172 39.451,31.002 45.855,31.002 45.905,31.052 69.985,31.052 72.908,33.975 v1(74.471,33.975)
AN_IN_9690_N: R4.2 U1.5
AN_IN_9690_P: R13.2 U1.6
AN_IN_N: C3.1 R7.2 T1.3 | length 5
  Bottom Layer w0.112: T1.3@36.458,79.552 ccw(c37.855,80.949) 37.855,78.973 38.792,78.973 cw(c38.792,78.494) 39.131,78.833 cw(c39.075,78.833) 39.115,78.794 39.115,77.869 39.11,77.864 39.11,77.834 cw(c39.036,77.834) 39.088,77.782 39.023,77.716 cw(c38.946,77.793) R7.2@38.946,77.685 38.946,77.075 cw(c38.91,77.075) 38.91,77.039 C3.1@38.91,76.833
AN_IN_P: C6.1 R7.1 T1.2 | length 4.8
  Bottom Layer w0.112: C6.1@39.647,76.833 39.647,76.988 ccw(c39.596,76.988) 39.596,77.039 R7.1@39.596,77.685 cw(c39.596,77.793) 39.519,77.716 39.454,77.782 cw(c39.506,77.834) 39.432,77.834 39.432,77.864 39.427,77.869 39.427,78.622 cw(c39.483,78.622) 39.444,78.662 39.444,78.833 cw(c39.782,78.494) 39.782,78.973 40.511,78.973 ccw(c40.511,80.949) T1.2@41.908,79.552
ATT_V1: U2.19 U5.17 | length 1.2
  Top Layer w0.2: U5.17@35.159,94.508 35.159,95.524
  Bottom Layer w0.2: U2.19@40.067,111.905 U2.19@40.225,111.905
ATT_V2: U2.20 U5.18 | length 1.3
  Top Layer w0.2: U5.18@34.509,94.508 34.509,95.539
  Bottom Layer w0.2: 40.001,112.405 U2.20@40.225,112.405
ATT_V3: U2.21 U5.19 | length 1.4
  Top Layer w0.2: U5.19@33.859,94.508 33.859,95.554
  Bottom Layer w0.2: 39.91,112.88 40.2,112.88 U2.21@40.225,112.905
ATT_V4: U2.22 U5.20 | length 1.5
  Top Layer w0.2: U5.20@33.209,94.508 33.209,95.569
  Bottom Layer w0.2: 39.845,113.38 40.2,113.38 U2.22@40.225,113.405
ATT_V5: U2.23 U5.21 | length 1.5
  Top Layer w0.2: U5.21@32.559,94.508 32.559,95.584
  Bottom Layer w0.2: 39.779,113.88 40.2,113.88 U2.23@40.225,113.905
ATT_V6: U2.24 U5.22 | length 1.9
  Top Layer w0.2: v1(30.265,93.608) U5.22@31.659,93.608
  Bottom Layer w0.2: 39.738,114.405 U2.24@40.225,114.405
AVDD1_1.25V: C83.2 C113.2 C114.2 C115.2 C116.2 C117.2 C118.2 C119.2 C120.2 C121.2 FB10.2 U1.1 U1.2 U1.47 U1.48 U1.49 U1.52 U1.55 U1.61 U1.64 | length 36.9
  Top Layer w0.3: C83.2@41.121,59.807 41.146,59.782 v1(41.883,59.782)
  Layer 3 w0.5: v1(38.505,66.233) 43.813,60.925 v1(43.813,60.036)
  Layer 4 w0.3: v1(41.883,59.782) 43.519,59.782 43.773,60.036 v1(43.813,60.036) ; v1@43.818,60.04 v1(43.813,60.036) ; v1@43.842,60.007 v1(43.813,60.036)
  Layer 4 w0.5: v1(30.005,68.883) 31.317,67.571 37.167,67.571 v1(38.505,66.233)
  Bottom Layer w0.3: C116.2@43.343,57.8 44.116,57.8 44.544,57.372 U1.61@44.987,57.372 ; C121.2@43.381,49.901 44.194,49.901 v1(44.728,50.434) 45.015,50.722 ; C117.2@43.387,50.561 v1@44.56,50.561 ; C118.2@43.407,52.543 43.407,52.553 43.921,52.553 44.24,52.872 U1.52@44.987,52.872 ; C113.2@43.407,60.036 v1(43.813,60.036) ; v1(44.372,59.324) 44.385,59.324 44.837,58.872 U1.64@44.987,58.872 ; v1(44.408,54.256) 44.449,54.256 44.565,54.372 U1.55@44.987,54.372 ; U1.49@44.987,51.372 44.987,50.75 45.015,50.722 ; C115.2@45.185,60.937 45.195,60.937 45.195,60.614 46.137,59.672 U1.2@46.137,59.522 ; C120.2@45.515,48.783 45.515,50.45 45.637,50.572 U1.48@45.637,50.722 ; C119.2@46.201,48.777 46.191,48.777 46.191,48.787 46.137,48.841 U1.47@46.137,50.722 U1.48@45.637,50.722 ; 45.015,50.722 U1.48@45.637,50.722
  other v1: 43.483,52.492 44.245,57.724
AVDD1_SR_1.25V: C93.2 C138.2 C139.2 C140.2 C141.2 FB13.2 U1.57 | length 10.8
  Top Layer w0.5: C141.2@39.713,61.737 39.413,61.437 39.413,61.001 38.417,60.006 C140.2@38.417,59.451 38.417,58.989 38.808,58.599 41.34,58.599 41.837,58.101 C93.2@41.837,57.699 ; FB13.2@41.709,56.276 42.572,55.413 44.245,55.413 v1(44.296,55.464)
  Bottom Layer w0.3: 44.61,55.372 U1.57@44.987,55.372
AVDD2_2.5V: C78.2 C99.2 C100.2 C101.2 C102.2 C103.2 C104.2 C105.2 C106.2 C107.2 C108.2 C109.2 C110.2 C111.2 FB4.2 U1.3 U1.8 U1.9 U1.10 U1.11 U1.39 U1.40 U1.41 U1.46 U1.50 U1.51 U1.62 U1.63 | length 30.4
  Top Layer w0.5: v1(41.908,68.672) 41.908,69.501 C78.2@41.986,69.58 42.024,69.617 42.024,70.858 FB4.2@42.061,70.895
  Layer 3 w0.5: v1(41.908,68.672) 41.908,64.836 v1(45.947,60.798)
  Layer 4 w0.3: 43.635,58.512 44.372,58.512 45.947,60.086 v1(45.947,60.798) 45.955,60.798 46.428,61.271 49.131,61.271 v1(49.96,60.442)
  Bottom Layer w0.3: C100.2@43.317,59.121 43.317,58.791 43.444,58.664 43.482,58.626 v1@43.546,58.626 ; v1@43.564,58.67 43.862,58.372 U1.63@44.987,58.372 U1.62@44.987,57.872 ; U1.50@44.987,51.872 44.622,51.872 43.981,51.232 43.686,51.232 43.407,51.511 C99.2@43.407,51.857 43.407,51.867 44.007,51.867 44.512,52.372 U1.51@44.987,52.372 ; v1(45.947,60.798) 46.637,60.107 U1.3@46.637,59.522 ; U1.46@46.637,50.722 46.637,49.597 46.851,49.383 46.851,48.783 C111.2@46.861,48.783
  other v1: 46.836,49.19 43.508,51.577 43.546,58.766
AVDD3_3.3V: C122.2 C123.2 C124.2 C125.2 C146.2 L8.2 U1.4 U1.7 U1.42 U1.45 | length 28
  Top Layer w0.5: C146.2@44.413,65.201 44.371,65.158 44.371,63.668 L8.2@44.328,63.626 44.328,63.371 47.054,60.645 v1(48.817,60.645)
  Layer 3 w0.5: v1(46.912,60.696) 48.512,59.096 48.512,51.507 47.826,50.821 v1(47.826,48.936)
  Bottom Layer w0.3: C125.2@46.709,60.937 46.719,60.937 46.883,60.773 46.883,60.725 v1(46.912,60.696) 46.912,60.655 47.137,60.43 U1.4@47.137,59.522 ; U1.45@47.137,50.722 47.137,50.031 47.537,49.632 47.537,48.783 C123.2@47.547,48.783 ; C122.2@48.231,48.797 48.217,48.783 C122.2@48.207,48.783 48.207,49.926 48.637,50.356 U1.42@48.637,50.722 ; U1.7@48.637,59.522 48.637,59.879 48.868,60.11 48.868,60.894 48.79,60.972 48.79,61.267 C124.2@48.665,61.267
CLK_GND: C171.2 C172.2 C173.2 C222.2 FB21.2 R79.2 R84.1 | length 17.7
  Top Layer w0.3: C173.2@51.423,29.149 51.464,29.108 C172.2@52.703,29.108 53.958,29.108 55.665,30.815 C171.2@55.665,34.89 55.562,34.993 55.562,37.785 C222.2@55.458,37.889 55.208,38.139 55.208,38.234 54.109,39.333 54.109,39.872 v1(54.081,39.901) 54.081,40.576 53.999,40.658 v1(53.999,42.764)
  Bottom Layer w0.3: v1(53.999,42.764) 54.006,42.771 R84.1@54.081,42.771
CLKin0_1_N: C223.1 R87.1 R92.2 | length 3.5
  Bottom Layer w0.112: R92.2@18.018,67.935 ccw(c18.018,68.056) 18.103,67.97 R92.2@18.257,68.125 ; R92.2@18.258,68.125 cw(c18.515,67.867) 18.515,68.231 18.666,68.231 18.669,68.234 18.93,68.234 cw(c18.93,67.818) R87.1@19.224,68.112 ; R87.1@19.224,68.112 19.311,68.025 cw(c19.225,67.94) R87.1@19.346,67.94 cw(c19.467,67.94) 19.381,68.025 cw(c19.884,67.522) 19.884,68.234 20.533,68.234 20.535,68.236 20.798,68.236 cw(c20.798,68.124) 20.877,68.203 20.878,68.202 cw(c20.801,68.125) 20.91,68.125 ccw(c21.02,68.125) 20.942,68.048 C223.1@21.004,67.986
CLKin0_1_P: C224.1 R87.2 R93.2 | length 3.5
  Bottom Layer w0.112: R93.2@18.018,68.84 cw(c18.018,68.719) 18.103,68.805 18.303,68.605 ccw(c18.45,68.752) 18.45,68.544 18.537,68.544 18.539,68.546 18.93,68.546 ccw(c18.93,68.962) 19.224,68.668 19.311,68.755 ccw(c19.225,68.84) R87.2@19.346,68.84 ccw(c19.467,68.84) 19.381,68.755 ccw(c19.884,69.258) 19.884,68.546 20.404,68.546 20.406,68.548 20.798,68.548 ccw(c20.798,68.661) 20.877,68.581 20.878,68.582 ccw(c20.801,68.66) 20.91,68.66 cw(c21.02,68.66) 20.942,68.737 C224.1@21.004,68.799
CLKin0_N: J13.2 R92.1 | length 7.5
  Bottom Layer w0.112: J13.2@11.631,66.259 11.631,68.124 cw(c11.744,68.124) 11.664,68.203 cw(c11.744,68.124) 11.744,68.236 14.216,68.236 14.221,68.231 16.562,68.231 cw(c16.562,67.726) 16.92,68.083 17.033,67.97 ccw(c17.118,68.056) R92.1@17.118,67.935
CLKin0_P: J14.2 R93.1 | length 7.5
  Bottom Layer w0.112: J14.2@11.631,70.526 11.631,68.661 ccw(c11.744,68.661) 11.664,68.581 ccw(c11.744,68.661) 11.744,68.548 14.346,68.548 14.35,68.544 16.562,68.544 ccw(c16.562,69.05) 16.92,68.692 17.033,68.805 cw(c17.118,68.719) R93.1@17.118,68.84
CLKin1_1_N: C225.1 R94.2 R95.1 | length 3.2
  Bottom Layer w0.112: C225.1@44.714,45.761 44.808,45.667 ccw(c44.843,45.667) 44.818,45.643 ccw(c44.953,45.777) 44.953,45.587 45.556,45.587 ccw(c45.556,46.003) 45.85,45.709 45.937,45.795 ccw(c45.852,45.881) R95.1@45.972,45.881 ccw(c46.093,45.881) 46.008,45.795 ccw(c46.511,46.298) 46.511,45.587 46.983,45.587 ccw(c46.983,46.101) 47.346,45.737 47.462,45.852 cw(c47.547,45.767) R94.2@47.547,45.888
CLKin1_1_P: C226.1 R95.2 R96.2 | length 3.2
  Bottom Layer w0.112: C226.1@44.714,45.1 44.808,45.194 cw(c44.843,45.194) 44.818,45.219 cw(c44.953,45.084) 44.953,45.274 45.556,45.274 cw(c45.556,44.858) 45.85,45.153 45.937,45.066 cw(c45.852,44.981) R95.2@45.972,44.981 cw(c46.093,44.981) 46.008,45.066 cw(c46.511,44.563) 46.511,45.274 46.983,45.274 cw(c46.983,44.761) 47.346,45.124 47.462,45.009 ccw(c47.547,45.094) R96.2@47.547,44.973
CLKin1_N: P1.53 R94.1 | length 49.5
  Layer 3 w0.097: v1(46.801,8.093) cw(c46.801,8.212) 46.717,8.128 46.625,8.22 46.625,12.262 46.625,13.42 cw(c49.165,13.42) 47.369,15.216 50.189,18.036 ccw(c48.185,20.04) 51.019,20.04 51.019,27.366 cw(c51.223,27.366) 51.223,27.57 52.048,27.57 ccw(c52.048,28.071) 52.549,28.071 52.549,28.776 ccw(c52.048,28.776) 52.048,29.277 49.693,29.277 cw(c49.693,29.481) 49.489,29.481 49.489,30.187 cw(c49.693,30.187) 49.693,30.391 52.048,30.391 ccw(c52.048,30.892) 52.549,30.892 52.549,31.597 ccw(c52.048,31.597) 52.048,32.098 51.223,32.098 cw(c51.223,32.302) 51.019,32.302 51.019,44.672 ccw(c50.112,44.672) 50.112,45.579 50.005,45.579 cw(c50.005,46.044) 49.676,45.715 ccw(c49.579,45.618) v1(49.579,45.756)
  Bottom Layer w0.112: R94.1@48.447,45.888 cw(c48.447,45.767) 48.532,45.852 48.605,45.78 ccw(c49.071,46.246) 49.071,45.587 49.225,45.587 ccw(c49.225,45.875) 49.429,45.671 49.467,45.709 cw(c49.579,45.597) v1(49.579,45.756)
CLKin1_P: P1.55 R96.1 | length 49